# Altium PCB PCB_COMM.PcbDoc
Units mil, origin at the board's own origin, x right, y up, seen from the top; angles counter-clockwise.
Board outline 2371.13 x 2367.34 mil, 2 copper layers (Top Layer, Bottom Layer); 4 components, 12 nets, 37 pads, 5 vias.
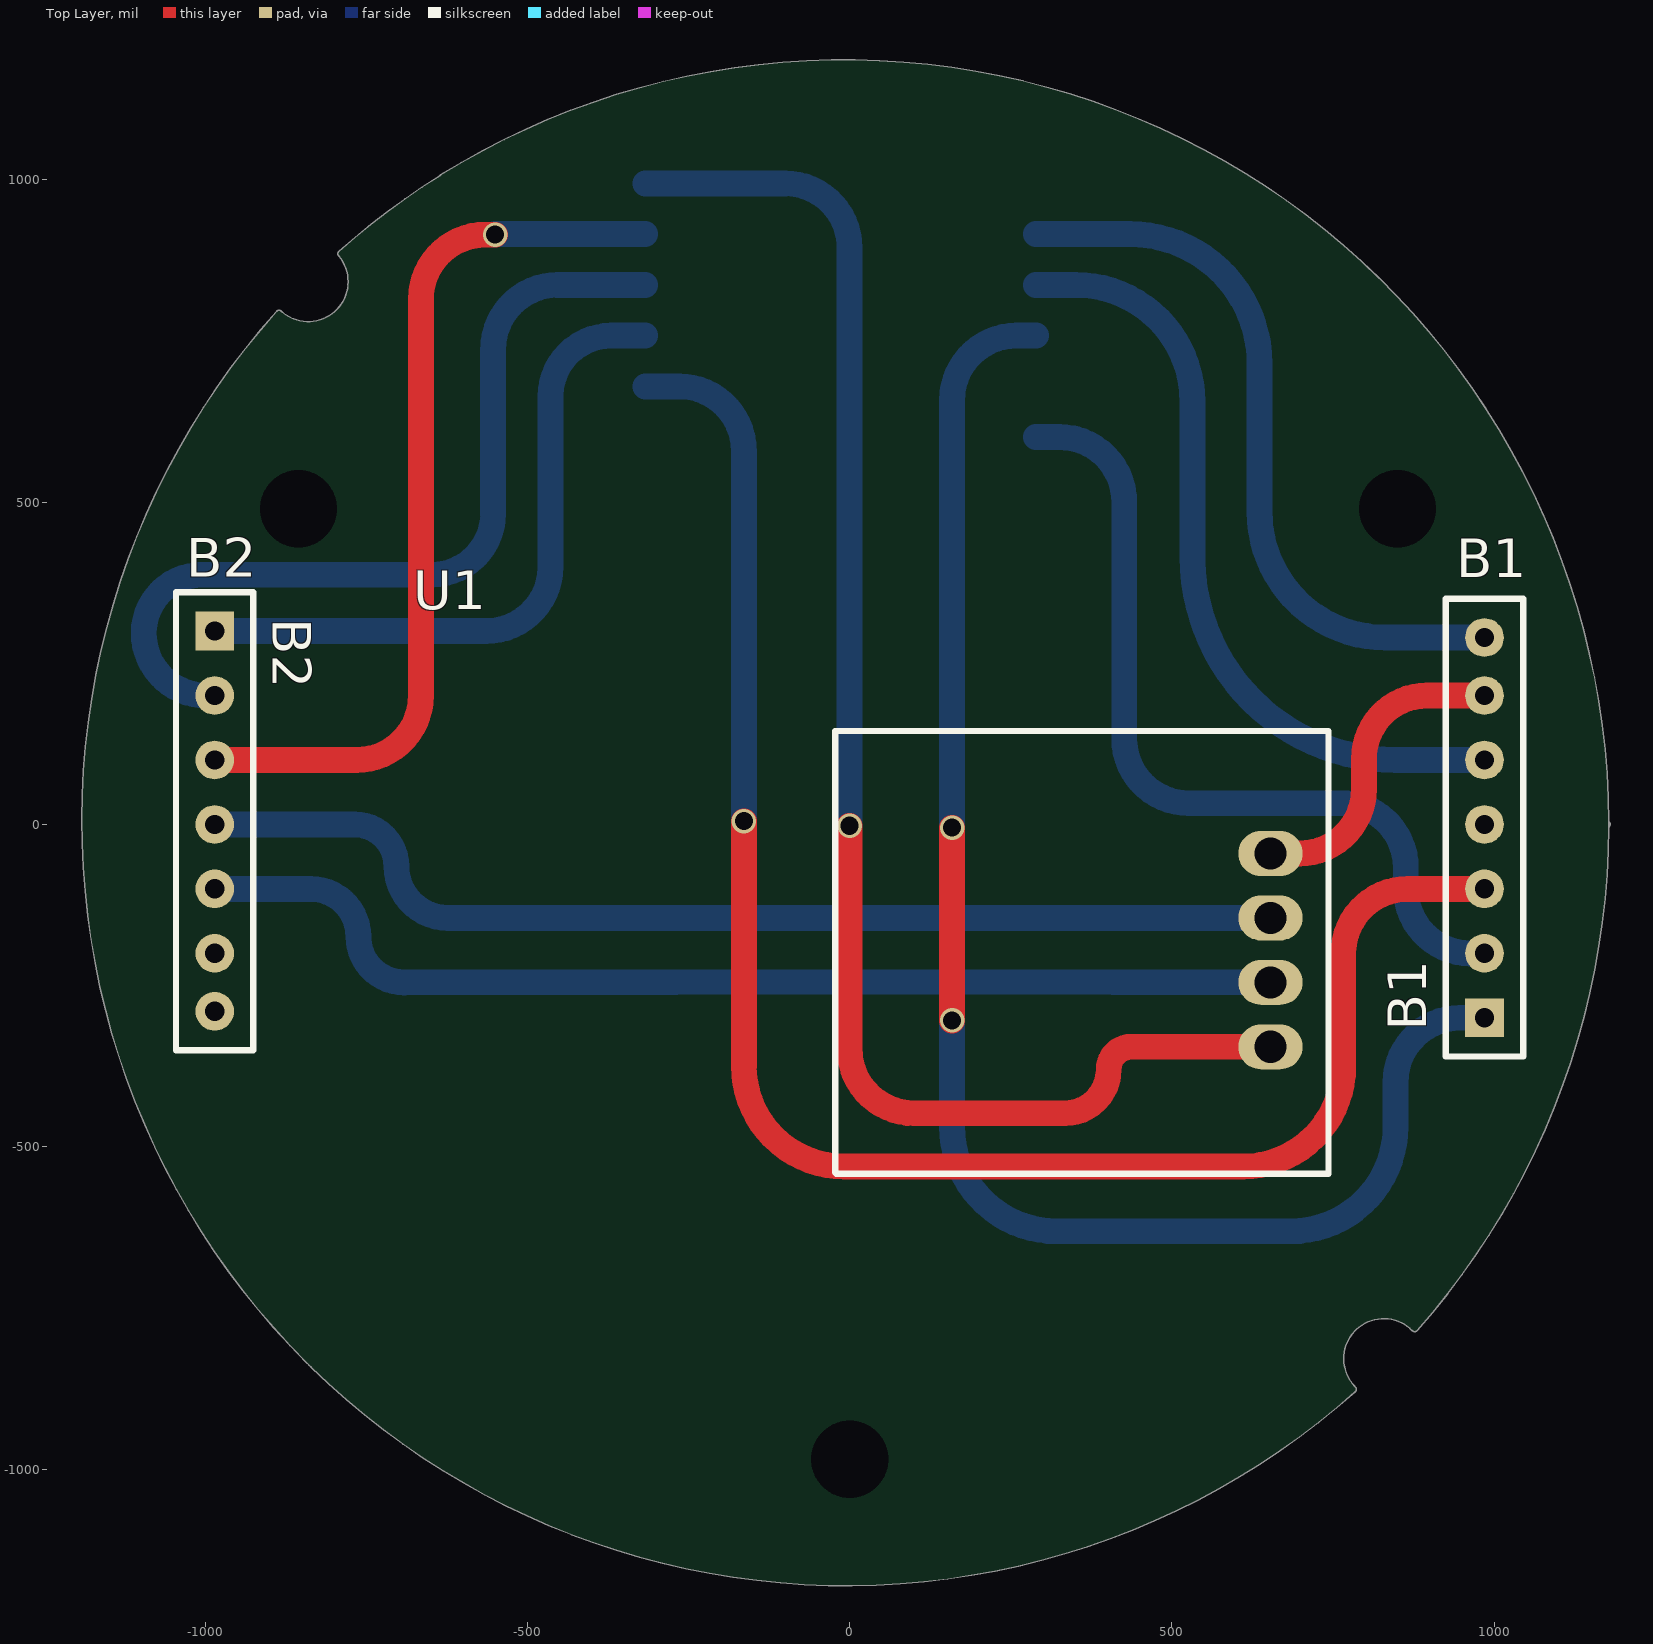
[diagram p0: Top Layer view]
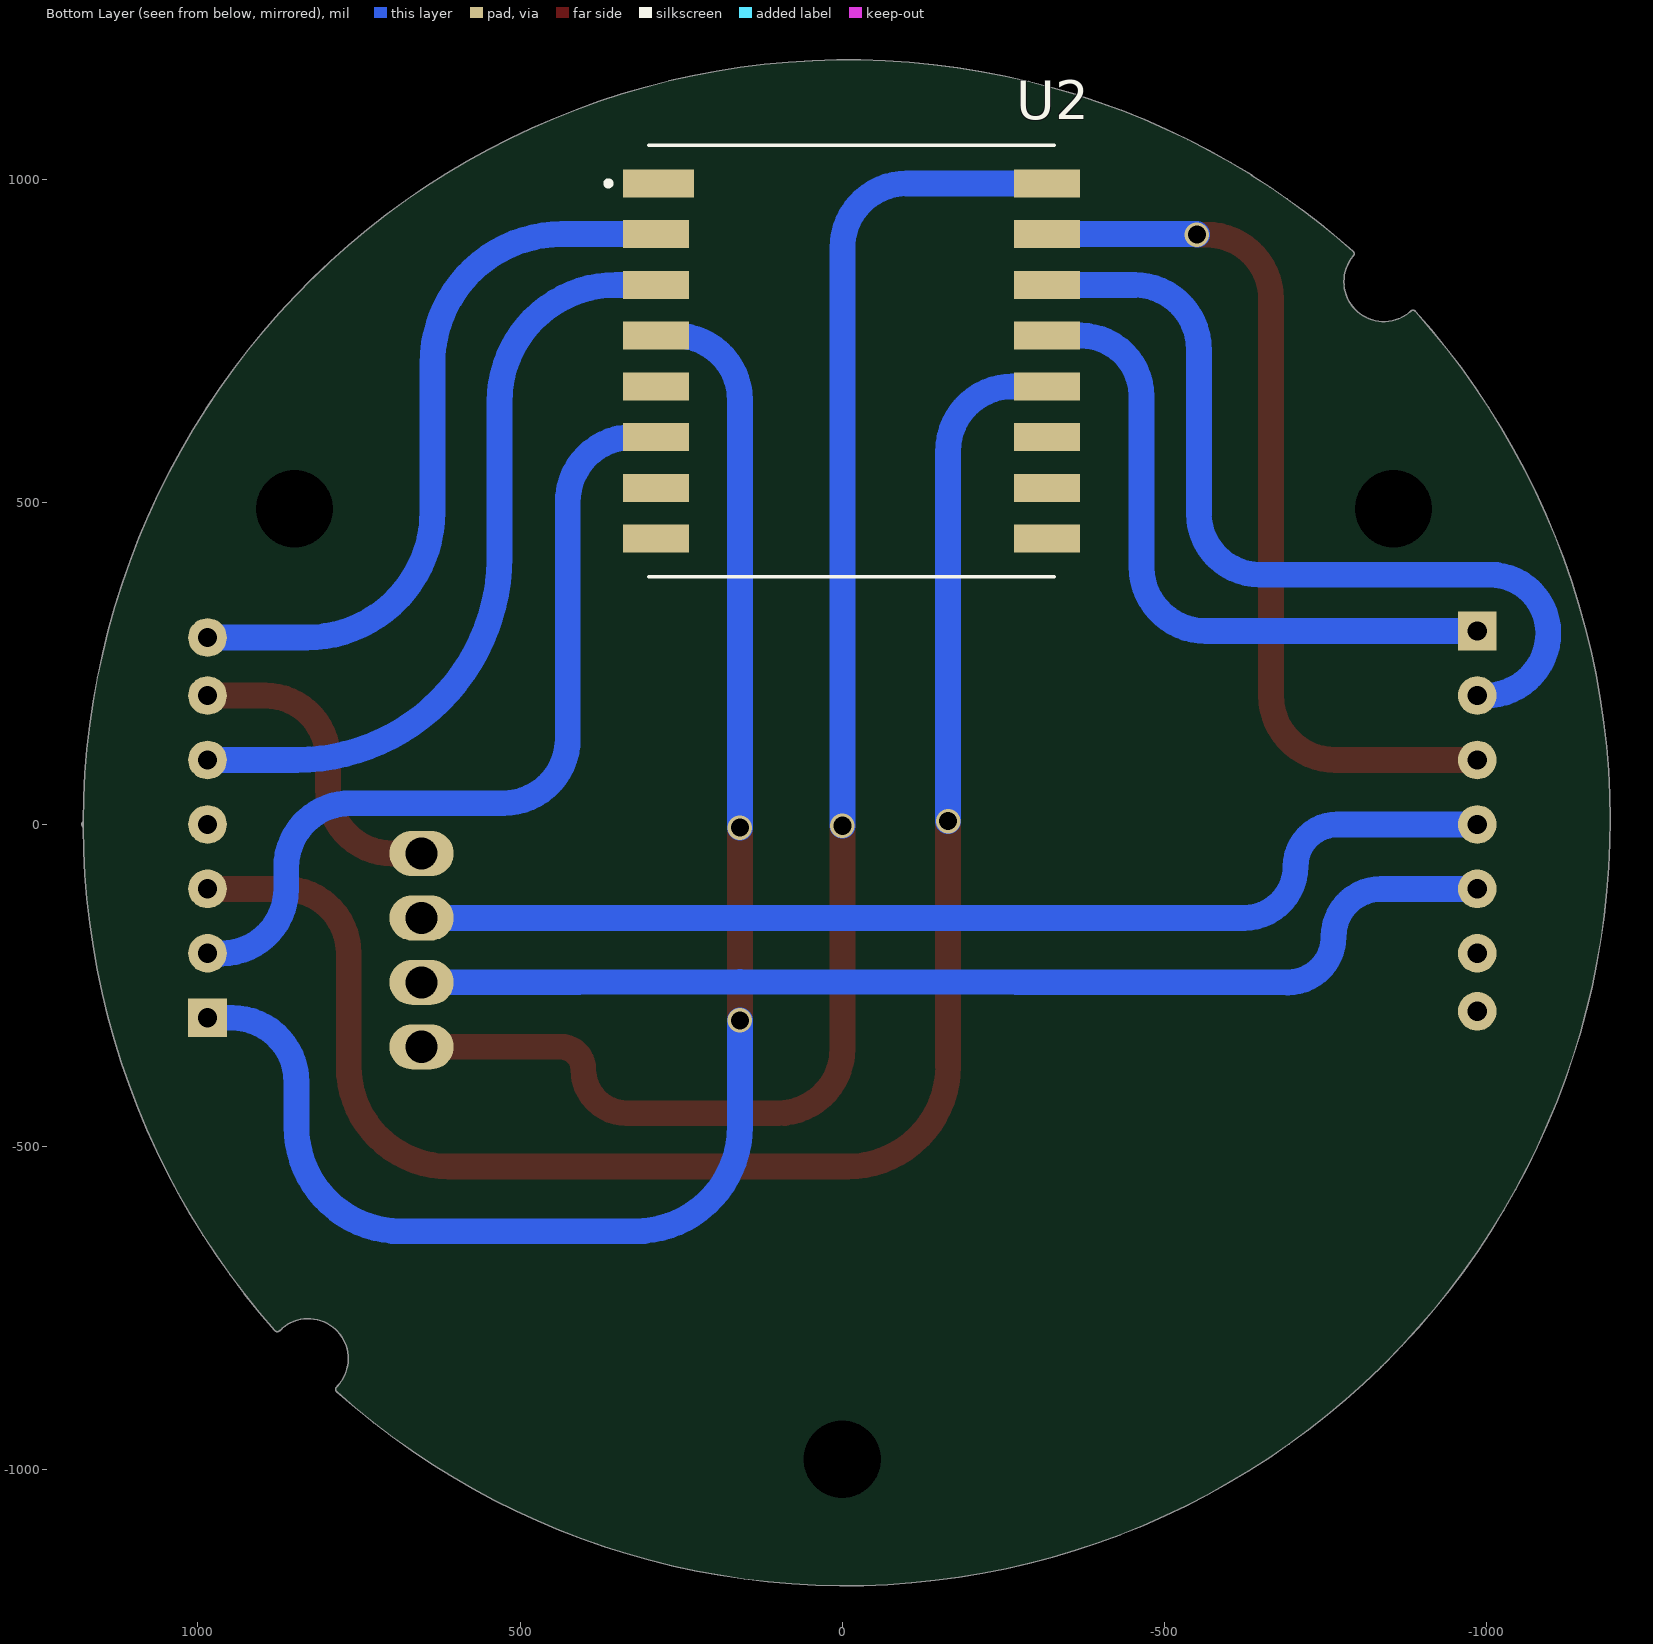
[diagram p1: Bottom Layer view, seen from below]
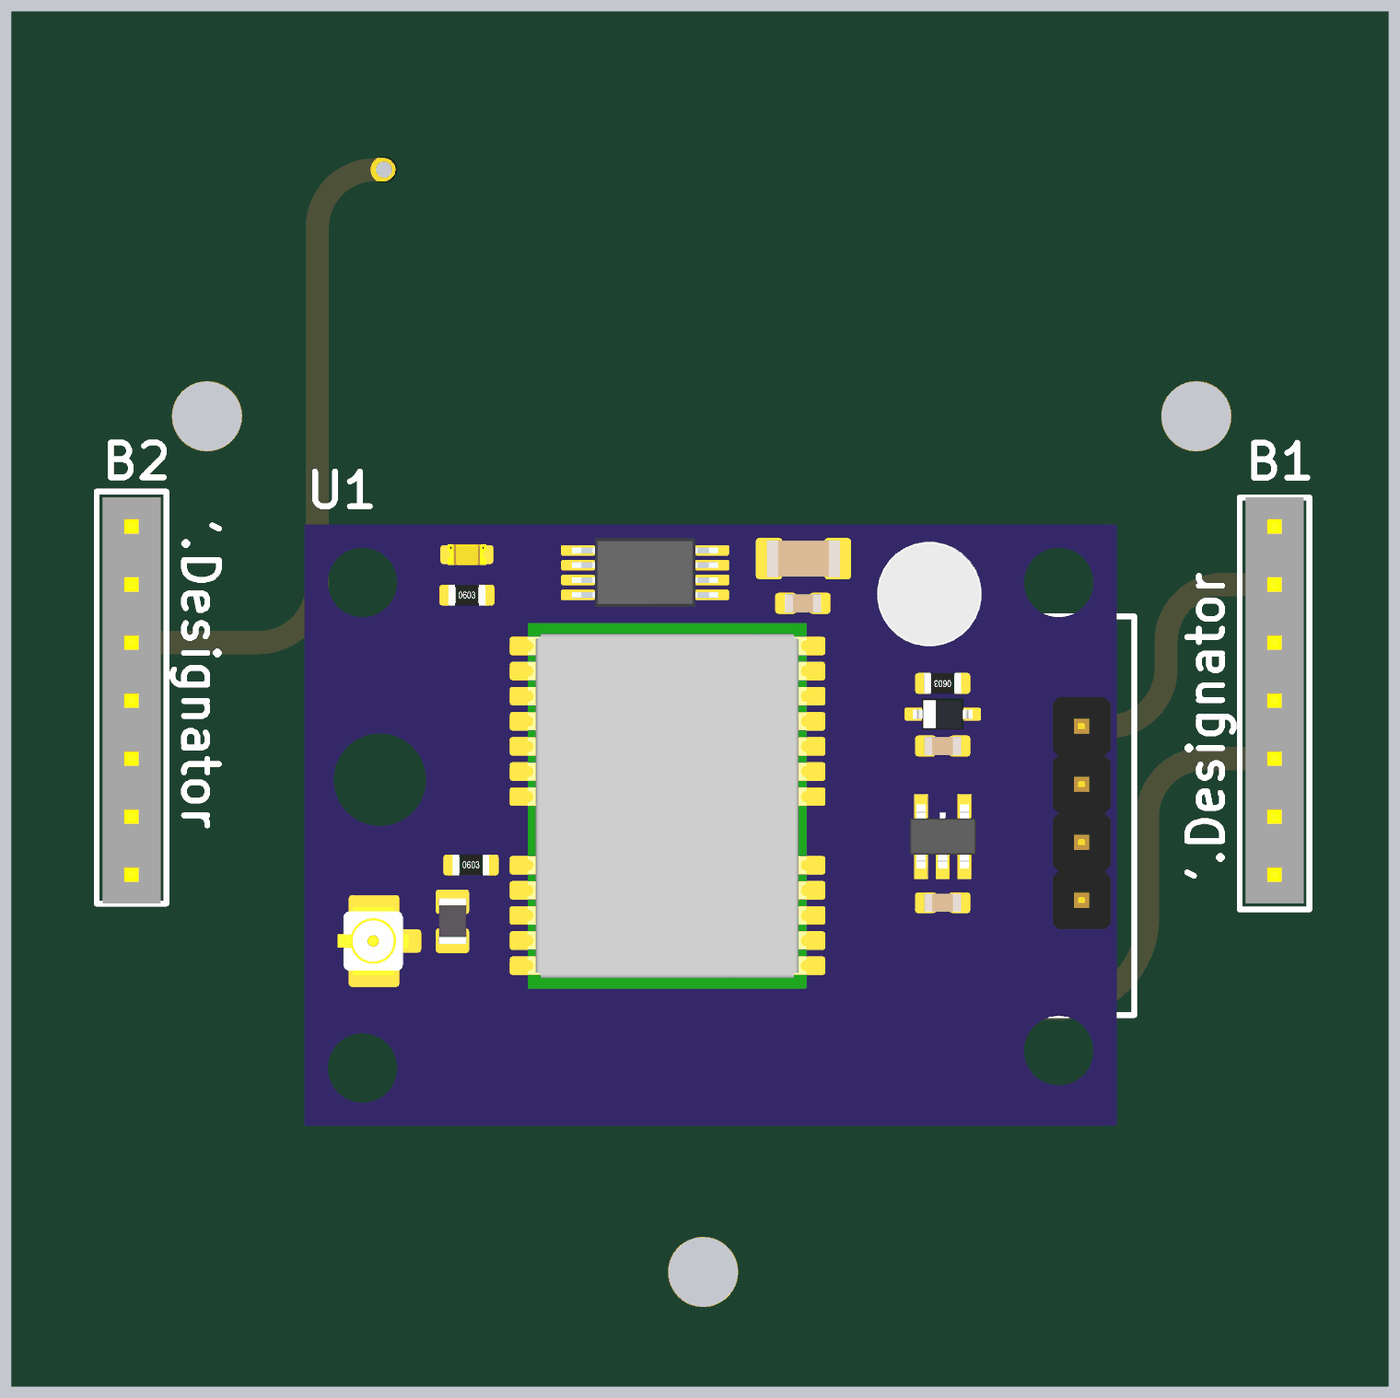
[diagram p2: 3D render of the assembled board from above, using the file's embedded part models]

## Layer stack, top to bottom
Top Solder: solder mask 0.4, Solder Resist, Dk 3.5
Top Layer: signal copper 1.4
Dielectric 1: dielectric 12.6, FR-4, Dk 4.8
Bottom Layer: signal copper 1.4
Bottom Solder: solder mask 0.4, Solder Resist, Dk 3.5

## Board outline
-842.04,-835.38 ccw(c-5,5) -835.32,-842.02 ccw(c-5,5) 784.57,-880.13 ccw(c781.23,-876.38) 786.25,-876.38 ccw(c781.23,-876.38) 784.3,-872.41 ccw(c780,-875) 783.64,-871.55 cw(c828.68,-828.85) 783.19,-786.62 cw(c828.68,-828.85) 786.62,-783.21 cw(c828.68,-828.85) 873.05,-785.45 ccw(c876.64,-781.94) 880.21,-785.47 ccw(c876.76,-781.82) 880.52,-785.14 ccw(c-8.3,0.27) 1177.81,-4.16 ccw(c1175,0) 1180.02,0 ccw(c1175,0) 1177.81,4.16 cw(c-8.3,0.27) 1177.81,0.27 cw(c-8.3,0.27) 1177.81,-4.16 1177.81,4.16 ccw(c-8.3,0.27) -634.39,1007.68 ccw(c-631.75,1003.42) -635.66,1006.56 ccw(c-5,2) -792.2,889.23 ccw(c-788.88,885.48) -792.4,881.92 cw(c-840,842.08) -777.93,842.08 cw(c-840,842.08) -880.79,795.3 ccw(c-885.08,792.7) -888.81,796.04 ccw(c-5,5) -888.96,795.88 ccw(c-5,5)

## Design rules (kind name [scope] priority, off if disabled: settings)
Clearance [All] p1: gap=20 ignorepadtopadclearanceinfootprint=FALSE
PolygonConnect [All] p1: connectstyle=Relief reliefconductorwidth=10 reliefentries=4 polygonreliefangle="90 Angle" airgapwidth=10
RoutingVias [All] p1: holewidth=28 width=38 viastyle="Through Hole" minholewidth=28 minwidth=38 maxholewidth=28 maxwidth=38
SolderMaskExpansion [All] p1: expansion=4 istentingtop=FALSE
Width [All] p1: maxlimit=45 minlimit=35 preferedwidth=40
30 further rules are at their usual default settings.

## Components (designator, comment, footprint, x,y, rotation, side; value= is the part's Value field where it differs from the comment)
B1 "I2C" "bus left" 985,-300 r90 top
B2 "SPI" "bus right" -985,300 r270 top
U1 "NEO_6M" NEO_6M 653,-195 r0 top
U2 "RA-02_LORA" MODULE_RA-02_LORA -14,719 r180 bottom

## Footprints (in the part's own frame and the unit in brackets; to place one, negate y for a bottom-side part, rotate by r counter-clockwise, add the part's x,y. Pads: shape width x height; smd on the part's side, far side on the other; paste and mask are expansions set on the pad)
"bus left" [mil]
  rect 60x60 hole 30: 1(0,0)
  round 60 hole 30: 2(100,0) 3(200,0) 4(300,0) 5(400,0) 6(500,0) 7(590,0)
  silkscreen extent -60,-60 650,60, body extent -50,-50 650,50, height 621
"bus right" [mil]
  rect 60x60 hole 30: 1(0,0)
  round 60 hole 30: 2(100,0) 3(200,0) 4(300,0) 5(400,0) 6(500,0) 7(590,0)
  silkscreen extent -60,-60 650,60, body extent -50,-50 650,50, height 621
MODULE_RA-02_LORA [mm]
  rect 2.8x1.1 smd: 1(-7.6,7)
  rect 2.6x1.1 smd: 2(-7.7,5) 3(-7.7,3) 4(-7.7,1) 5(-7.7,-1) 6(-7.7,-3) 7(-7.7,-5) 8(-7.7,-7) 9(7.7,-7) 10(7.7,-5) 11(7.7,-3) 12(7.7,-1) 13(7.7,1) 14(7.7,3) 15(7.7,5) 16(7.7,7)
  silkscreen extent -9.68,-8.5 8,8.5, body extent -8,-8.5 8,8.5, height 3.3
NEO_6M [mil]
  oval 100x70 hole 50: 1(0,150) 2(0,50) 3(0,-50) 4(0,-150)
  silkscreen extent -675,-347 90,340, body extent -1340,-539 60,499, height 393

## Part data
B1: library part "BUS left"
B2: library part "BUS right"
U2: "Ra-02 LoRa RF M5Stack Platform Evaluation Expansion Board", Package=None, Check_prices=https://www.snapeda.com/parts/Ra-02%20LoRa/AI-Thinker/view-part/?ref=eda, MF=AI-Thinker, MP="Ra-02 LoRa", SnapEDA_Link=https://www.snapeda.com/parts/Ra-02%20LoRa/AI-Thinker/view-part/?ref=snap

## Free pads (board coordinates)
  round 0 hole 120: 2(-855,490) 2(0,-985) 2(850,490)

## Via types
v1: diameter 38, hole 28, Top Layer to Bottom Layer, 5 vias

## Nets (pads, with @x,y where several pads share a name; then routed paths per layer and width w, separated by ;. In a path a pad name is that pad's centre, name@x,y a point inside that pad or via, vN(x,y) a via of type N, cw(c..) or ccw(c..) an arc to the next point about the centre after c; other vN are vias at no path point)
NetB1_1: B1.1 U2.4 | length 2451.7
  Top Layer w40: v1(159,-304) v1(159,-5)
  Bottom Layer w40: v1(159,-304) 159,-469 ccw(c321.11,-469) 321.11,-631.11 684.89,-631.11 ccw(c684.89,-469) 847,-469 847,-400 cw(c947,-400) 947,-300 B1.1 ; v1(159,-5) 159,658.37 cw(c259,658.37) 259,758.37 U2.4
NetB1_2: B1.2 U2.6 | length 1325.1
  Bottom Layer w40: U2.6 326,600.89 cw(c326,500.89) 344.11,599.24 cw(c326,500.89) 350.31,597.89 cw(c326,500.89) 423,525.2 cw(c326,500.89) 426,500.89 426,133 ccw(c526,133) 526,33 763,33 cw(c763,-67) 798.24,26.58 cw(c763,-67) 854.19,-25.95 cw(c763,-67) 863,-67 863,-100 ccw(c963,-100) 963,-200 B1.2
NetB1_3: B1.3 U2.12 | length 2723.8
  Top Layer w40: v1(-164,5) -164,-375 ccw(c-8.21,-375) -8.21,-530.79 610.21,-530.79 ccw(c610.21,-375) 766,-375 766,-200 cw(c866,-200) 866,-100 B1.3
  Bottom Layer w40: U2.12 -264,679.63 cw(c-264,579.63) -164,579.63 v1(-164,5)
NetB1_5: B1.5 U2.3 | length 1220
  Bottom Layer w40: U2.3 350.89,837.11 cw(c350.89,656) 532,656 532,415 ccw(c847,415) 847,100 B1.5
NetB1_6: B1.6 U1.1 | length 492
  Top Layer w40: U1.1 698,-45 ccw(c698,55) 798,55 798,102 cw(c896,102) 896,200 B1.6
NetB1_7: B1.7 U2.2 | length 1151.8
  Bottom Layer w40: U2.2 435.15,915.85 cw(c435.15,715) 636,715 636,485 ccw(c831,485) 831,290 B1.7
NetB2_1: B2.1 U2.13 | length 1348.1
  Bottom Layer w40: B2.1 -564,300 ; U2.13 -369.63,758.37 ; -564,300 ccw(c-564,400) -464,400 ; -564,300 ccw(c-564,400) -464,400 ; -464,400 -464,664 ; -464,664 cw(c-369.63,664) -369.63,758.37 ; -464,664 cw(c-369.63,664) -369.63,758.37
NetB2_2: B2.2 U2.14 | length 1360.8
  Bottom Layer w40: B2.2 -998,200 cw(c-998,297) -1095,297 cw(c-1004.53,297) -1004.53,387.47 -648,387.47 ccw(c-648,482.47) -553,482.47 -553,737.11 cw(c-453,737.11) -453,837.11 U2.14
NetB2_3: B2.3 U2.15 | length 1398.8
  Top Layer w40: B2.3 -765,100 ccw(c-765,200) -665,200 -665,815 cw(c-565,815) -565,915 v1(-550,915)
  Bottom Layer w40: U2.15 v1@-549.15,915.85 ; v1@-549.15,915.85 ccw(c-549.15,915) v1(-550,915) cw(c-549.15,915) v1@-549.15,915.85
NetB2_4: B2.4 U1.2 | length 1720.8
  Bottom Layer w40: B2.4 -768,0 cw(c-768,-65) -703,-65 ccw(c-623,-65) -623,-145 U1.2
NetB2_5: B2.5 U1.3 | length 1720.8
  Bottom Layer w40: B2.5 -836,-100 cw(c-836,-174) -762,-174 ccw(c-691,-174) -691,-245 158.85,-244 cw(c159,-304) 159.22,-244 U1.3
NetU1_4: U1.4 U2.16 | length 2385.7
  Top Layer w40: v1(0,-2) 0,-348 ccw(c100,-348) 100,-448 334,-448 ccw(c334,-380) 402,-380 cw(c437,-380) 437,-345 U1.4
  Bottom Layer w40: U2.16 -100,994.59 cw(c-100,894.59) 0,894.59 v1(0,-2)
pads on no net: B1.4 B2.6 B2.7 U2.1 U2.5 U2.7 U2.8 U2.9 U2.10 U2.11

## Silkscreen, mask and mechanical layers (free items; w line width, h text height)
Mechanical 1:
  lines w10: -885.22,792.53 ccw(c-840,842.08) -788.86,885.5 ; -885.08,792.7 ccw(c-5,5) 781.23,-876.38 ; -788.88,885.48 cw(c-5,2) -590,1028.05 ; -631.75,1003.42 cw(c-8.3,0.27) 876.76,-781.82 ; 780,-875 cw(c828.68,-828.85) 876.64,-781.94
Mechanical 13:
  lines w10: -1175,0 1175,0 ; -837.5,-837.5 831,831 ; -792.5,792.5 781.81,-781.81 ; 0,-1175 0,1182 ; 984.17,-12.59 cw(c0,0) 984.24,4.03